# Altium PCB POV_Display.PcbDoc (part 4 of 4)
Units mm, origin at the board's own origin, x right, y up, seen from the top; angles counter-clockwise.
Board outline 207.01 x 48.01 mm, 4 copper layers (Top Layer, GND, Power, Bottom Layer), stack 1.586 mm thick; 227 components, 374 nets, 1196 pads, 657 vias.
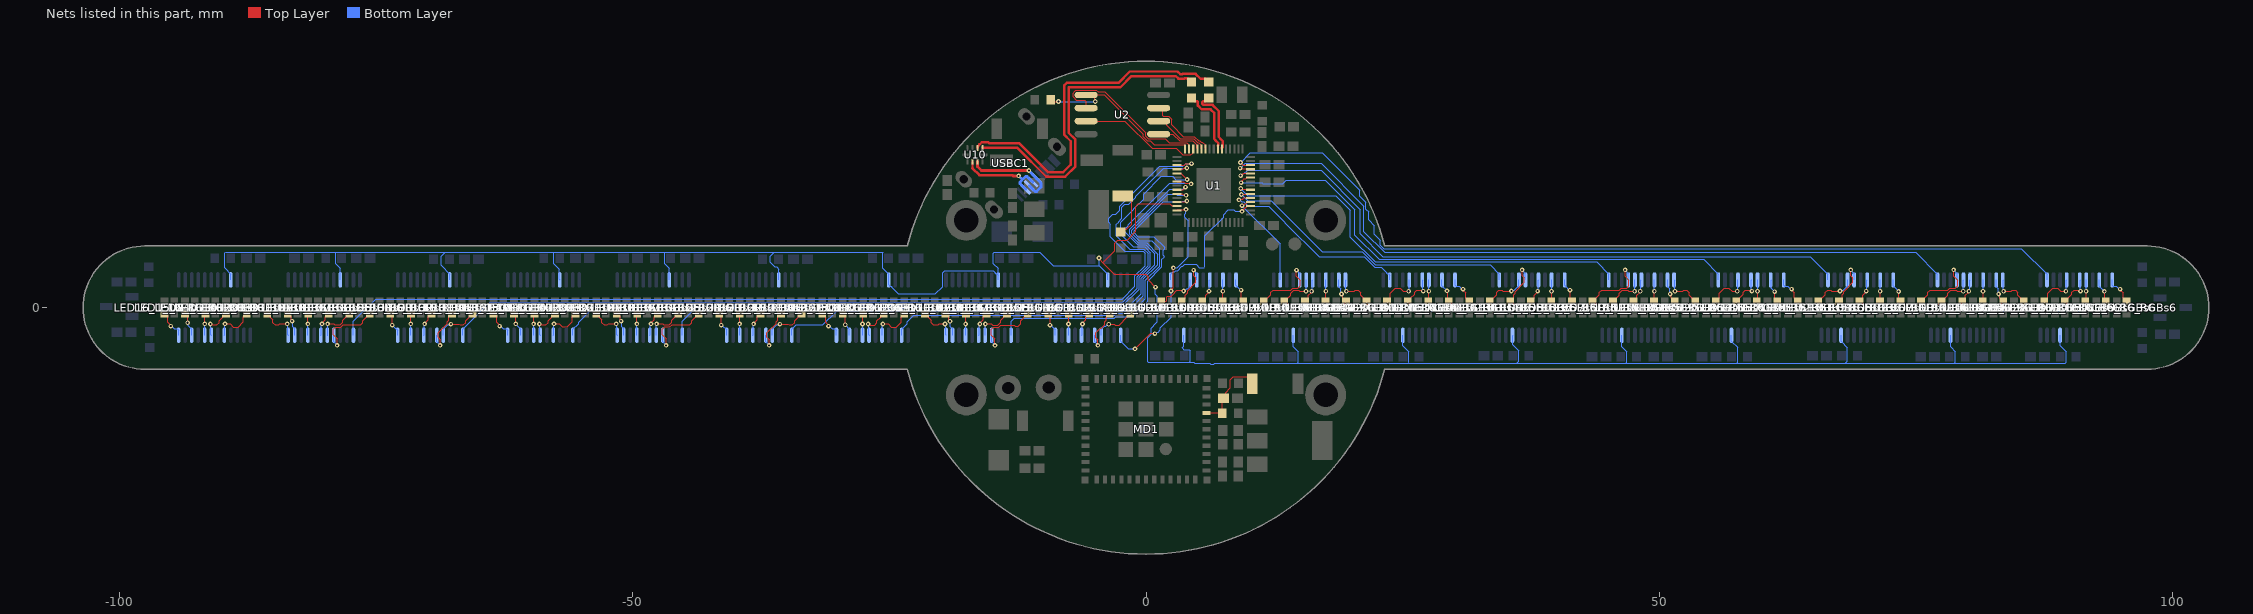
[diagram p6: the nets of this part, all layers, seen from the top]

## Via types
v1: diameter 0.45, hole 0.2, Top Layer to Bottom Layer, tented both sides, 605 vias
v2: diameter 0.65, hole 0.4, Top Layer to Bottom Layer, tented both sides, 28 vias
v3: diameter 0.5, hole 0.3, Top Layer to Bottom Layer, tented both sides, 12 vias
v4: diameter 0.45, hole 0.2, Top Layer to Bottom Layer, 12 vias

## Nets (pads, with @x,y where several pads share a name; then routed paths per layer and width w, separated by ;. In a path a pad name is that pad's centre, name@x,y a point inside that pad or via, vN(x,y) a via of type N, cw(c..) or ccw(c..) an arc to the next point about the centre after c; other vN are vias at no path point) (continued)
NetU1_3: U1.3 U7_U_16_RGBs3.2 | length 100.4
  Top Layer w0.1: U1.3@3.025,13.875 3.724,13.875 3.874,14.025 v1(4.425,14.025)
  Bottom Layer w0.1: U7_U_16_RGBs3.2@-77.18,-2.685 -77.18,-1.33 -75.025,0.825 -2.325,0.825 -1.075,2.075 -1.075,3.099 -0.075,4.099 -0.075,5.301 -0.28,5.506 -2.081,5.506 -3.475,6.9 -3.475,8.128 -3.65,8.303 -3.65,8.697 -3.247,9.1 -2.953,9.1 -2.55,9.503 -2.55,9.855 1.345,13.75 3.584,13.75 3.859,14.025 v1(4.425,14.025)
NetU1_4: U1.4 U6_U_16_RGBs3.2 | length 87.5
  Top Layer w0.1: U1.4@3.025,13.474 3.599,13.474 3.68,13.555 3.935,13.555 v1(3.973,13.594)
  Bottom Layer w0.1: U6_U_16_RGBs3.2@-66.52,-2.685 -66.52,-2.112 -63.883,0.525 -2.242,0.525 -0.875,1.892 -0.875,3.016 0.2,4.091 0.2,5.309 -0.197,5.706 -1.606,5.706 -2.9,7 -2.9,8.103 -2.672,8.331 -2.672,8.382 -2.35,8.704 -2.35,9.772 -2.072,10.05 -1.7,10.05 -0.983,10.767 -0.983,10.849 1.718,13.55 3.929,13.55 v1(3.973,13.594)
NetU1_5: U1.5 U8_U_16_RGBs2.2 | length 76.2
  Top Layer w0.1: U1.5@3.025,13.075 3.361,13.075 3.512,12.924 3.551,12.924 v1(4,12.475)
  Bottom Layer w0.1: U8_U_16_RGBs2.2@-55.814,-2.684 -55.814,-2.111 -55.258,-1.556 -55.258,-1.444 -53.539,0.275 -2.209,0.275 -0.675,1.809 -0.675,2.933 0.425,4.033 0.425,5.367 -0.114,5.906 -1.256,5.906 -2.472,7.122 -2.472,8.299 -1.198,9.573 -1.198,9.632 -0.725,10.105 -0.666,10.105 -0.233,10.538 -0.233,11.053 1.491,12.777 2.595,12.777 2.897,12.475 v1(4,12.475)
NetU1_7: U1.7 U7_U_16_RGBs2.2 | length 65.6
  Top Layer w0.1: U1.7@3.025,12.275 3.645,12.275 3.82,12.1 4.35,12.1 v1(4.4,12.05)
  Bottom Layer w0.1: U7_U_16_RGBs2.2@-45.144,-2.684 -45.144,-1.329 -43.839,-0.025 -1.825,-0.025 -0.45,1.35 -0.45,2.875 0.85,4.175 0.85,5.225 -0.031,6.106 -0.814,6.106 -2.189,7.481 -2.189,7.58 -2.001,7.768 -1.942,7.768 -1.722,7.988 -1.722,8.047 2.33,12.1 4.35,12.1 v1(4.4,12.05)
NetU1_9: U1.9 U6_U_16_RGBs2.2 | length 52.9
  Top Layer w0.1: U1.9@3.025,11.475 3.612,11.475 3.852,11.716 v1(3.852,11.725)
  Bottom Layer w0.1: U6_U_16_RGBs2.2@-34.484,-2.684 -34.484,-2.111 -34.059,-1.687 -31.476,-1.687 -30.139,-0.35 -1.742,-0.35 -0.25,1.142 -0.25,2.787 1.154,4.191 1.154,5.204 0.051,6.306 -0.731,6.306 -1.574,7.149 -1.574,7.62 2.33,11.525 3.558,11.525 3.758,11.725 v1(3.852,11.725)
NetU1_10: U1.10 U8_U_16_RGBs1.2 | length 42.5
  Top Layer w0.1: U1.10@3.025,11.074 U1.10@3.025,11.074 3.553,11.072 3.634,10.991 3.867,10.991 v1(3.916,10.942)
  Bottom Layer w0.1: U8_U_16_RGBs1.2@-23.796,-2.692 -23.796,-2.12 -23.241,-1.564 -23.241,-1.367 -22.599,-0.725 -3.059,-0.725 -2.884,-0.55 -1.475,-0.55 -0.05,0.875 -0.05,2.646 1.354,4.05 1.354,5.715 0.562,6.506 -0.648,6.506 -1.374,7.232 -1.374,7.537 2.124,11.036 2.925,11.036 3.02,10.942 v1(3.916,10.942)
NetU1_12: U1.12 U7_U_16_RGBs1.2 | length 32.5
  Top Layer w0.1: U1.12@3.025,10.274 3.075,10.324 3.921,10.324 v1(3.975,10.378)
  Bottom Layer w0.1: U7_U_16_RGBs1.2@-13.126,-2.692 -13.126,-1.337 -12.839,-1.05 -3.102,-1.05 -2.927,-0.875 -1.325,-0.875 0.15,0.6 0.15,2.563 1.554,3.967 1.554,4.69 1.778,4.914 1.778,4.997 1.671,5.104 1.671,5.58 1.825,5.734 1.825,5.862 0.762,6.925 -0.784,6.925 -1.133,7.274 -1.133,7.496 1.666,10.295 3.55,10.295 3.6,10.345 3.942,10.345 v1(3.975,10.378)
NetU1_14: U1.14 U6_U_16_RGBs1.2 | length 19.7
  Top Layer w0.1: v1(-1.069,-4.023) 0.442,-2.511 0.851,-2.511 v1(0.867,-2.527) ; v1(2.437,1.617) 2.437,1.697 2.663,1.922 v1(2.663,3.873) ; U1.14@3.025,9.473 3.06,9.509 3.834,9.509 v1(3.9,9.575)
  Bottom Layer w0.1: U6_U_16_RGBs1.2@-2.466,-2.692 -2.466,-3.265 -1.709,-4.023 v1(-1.069,-4.023) ; v1(0.867,-2.527) 0.962,-2.527 1.113,-2.375 1.18,-2.375 1.4,-2.155 1.4,-1.975 2.437,-0.938 v1(2.437,1.617) ; v1(2.663,3.873) 3.054,3.873 4.125,4.945 4.125,8.464 3.791,8.798 3.791,9.085 3.889,9.182 3.889,9.564 v1(3.9,9.575)
NetU1_33: U1.33 U6_U_16_RGBs4.2 | length 13.4
  Top Layer w0.1: v1(9.348,9.378) 9.348,9.399 9.676,9.726 9.69,9.726 9.838,9.875 U1.33@10.175,9.875
  Bottom Layer w0.1: U6_U_16_RGBs4.2@2.412,2.692 2.412,3.265 2.646,3.498 2.817,3.498 2.912,3.593 3.07,3.593 3.502,4.025 3.557,4.025 3.762,4.23 4.873,4.23 5.203,3.9 5.668,3.9 5.727,3.959 5.727,6.993 7.55,8.817 7.55,9.055 8.013,9.519 8.563,9.519 8.704,9.378 v1(9.348,9.378)
NetU1_34: U1.34 U7_U_16_RGBs4.2 | length 9.7
  Top Layer w0.1: v1(9.348,9.928) 9.442,9.928 9.651,10.137 9.702,10.137 9.838,10.274 U1.34@10.175,10.274
  Bottom Layer w0.1: v1(9.348,9.928) 13.073,6.204 U7_U_16_RGBs4.2@13.073,2.692
NetU1_35: U1.35 U8_U_16_RGBs4.2 | length 19.4
  Top Layer w0.1: v1(9.05,10.5) 9.115,10.565 9.425,10.565 9.535,10.675 U1.35@10.175,10.675
  Bottom Layer w0.1: v1(9.05,10.5) 9.145,10.5 9.341,10.303 9.503,10.303 9.956,9.85 11.95,9.85 13.407,8.393 13.413,8.393 13.633,8.174 13.633,8.167 16.85,4.95 21.259,4.95 22.282,3.928 22.909,3.928 23.435,3.401 23.435,3.339 23.494,3.28 23.624,3.28 23.743,3.162 U8_U_16_RGBs4.2@23.743,2.692
NetU1_36: U1.36 U6_U_16_RGBs5.2 | length 29.8
  Top Layer w0.1: v1(9.278,11.014) 9.308,11.044 10.145,11.044 U1.36@10.175,11.074
  Bottom Layer w0.1: v1(9.278,11.014) 9.316,11.014 9.93,10.4 12.206,10.4 17.156,5.45 21.042,5.45 22.342,4.15 33.528,4.15 34.412,3.265 U6_U_16_RGBs5.2@34.412,2.692
NetU1_37: U1.37 U7_U_16_RGBs5.2 | length 42.4
  Top Layer w0.1: v1(9.225,11.6) 9.32,11.6 9.4,11.519 10.13,11.519 U1.37@10.175,11.475
  Bottom Layer w0.1: v1(9.225,11.6) v1(9.225,11.6) 9.922,10.9 18.494,10.9 19.9,9.494 19.9,6.875 22.325,4.45 43.888,4.45 45.073,3.265 U7_U_16_RGBs5.2@45.073,2.692
NetU1_40: U1.40 U8_U_16_RGBs5.2 | length 53.6
  Top Layer w0.1: v1(9.27,12.163) 9.27,12.257 9.467,12.455 9.467,12.467 9.525,12.525 9.69,12.525 9.838,12.674 U1.40@10.175,12.674
  Bottom Layer w0.1: v1(9.27,12.163) 11.301,12.163 11.379,12.085 13.315,12.085 13.655,12.425 17.45,12.425 20.35,9.525 20.35,7.05 22.7,4.7 54.308,4.7 55.742,3.265 U8_U_16_RGBs5.2@55.742,2.692
NetU1_41: U1.41 U6_U_16_RGBs6.2 | length 64.6
  Top Layer w0.1: v1(9.209,12.847) 9.284,12.847 9.512,13.075 U1.41@10.175,13.075
  Bottom Layer w0.1: v1(9.209,12.847) 9.283,12.847 9.511,13.076 9.582,13.076 9.887,13.381 17.045,13.381 20.875,9.551 20.875,7.175 23.075,4.975 64.703,4.975 66.413,3.265 U6_U_16_RGBs6.2@66.413,2.692
NetU1_42: U1.42 U7_U_16_RGBs6.2 | length 75.6
  Top Layer w0.1: v1(9.17,13.582) 9.228,13.524 10.125,13.524 U1.42@10.175,13.474
  Bottom Layer w0.1: v1(9.17,13.582) 9.21,13.582 9.679,14.05 17.05,14.05 21.223,9.877 21.223,7.392 23.24,5.375 74.963,5.375 77.073,3.265 U7_U_16_RGBs6.2@77.073,2.692
NetU1_43: U1.43 U8_U_16_RGBs6.2 | length 87.4
  Top Layer w0.1: v1(9.205,14.13) 9.225,14.13 9.48,13.875 U1.43@10.175,13.875
  Bottom Layer w0.1: v1(9.205,14.13) 10.15,15.075 17.161,15.075 20.823,11.413 20.823,10.839 21.423,10.239 21.423,9.569 21.675,9.317 21.675,8.553 22.25,7.978 22.25,7.121 22.826,6.545 22.826,6.072 23.143,5.755 85.253,5.755 87.743,3.265 U8_U_16_RGBs6.2@87.743,2.692
OE: U1.13 U6_U_16_RGBs1.21 U6_U_16_RGBs2.21 U6_U_16_RGBs3.21 U6_U_16_RGBs4.21 U6_U_16_RGBs5.21 U6_U_16_RGBs6.21 U7_U_16_RGBs1.21 U7_U_16_RGBs2.21 U7_U_16_RGBs3.21 U7_U_16_RGBs4.21 U7_U_16_RGBs5.21 U7_U_16_RGBs6.21 U8_U_16_RGBs1.21 U8_U_16_RGBs2.21 U8_U_16_RGBs3.21 U8_U_16_RGBs4.21 U8_U_16_RGBs5.21 U8_U_16_RGBs6.21 | length 258.1
  Top Layer w0.1: v1(-4.576,4.829) -4.576,4.745 -4.212,4.38 ; v1(0.925,2) 0.217,2.708 0.217,3.008 -0.025,3.25 -3.082,3.25 -4.212,4.38 ; U1.13@3.025,9.875 2.974,9.925 2.496,9.925 2.327,10.095 -0.736,10.095 -1,9.83 -1,9.52 -0.999,9.519 -0.999,7.422 -1.849,6.572 -2.774,6.572 -3.056,6.29 -3.056,5.536 -4.212,4.38
  Bottom Layer w0.1: U8_U_16_RGBs3.21@-89.12,2.7 -89.12,3.273 -89.71,3.863 -89.71,5.326 -89.622,5.414 -78.822,5.414 ; U7_U_16_RGBs3.21@-78.45,2.7 -78.45,3.829 -78.91,4.289 -78.91,5.326 -78.822,5.414 ; U6_U_16_RGBs3.21@-67.79,2.7 -67.79,3.273 -68.636,4.119 -68.636,5 -68.222,5.414 ; U8_U_16_RGBs2.21@-57.084,2.701 -57.133,2.749 -57.133,3.749 -57.674,4.29 -57.674,5.326 -57.586,5.414 ; U7_U_16_RGBs2.21@-46.414,2.701 -46.414,3.83 -46.874,4.29 -46.874,5.326 -46.786,5.414 ; U6_U_16_RGBs2.21@-35.754,2.701 -35.754,3.751 -35.973,3.971 -36.154,3.971 -36.6,4.416 -36.6,5 -36.194,5.406 ; U7_U_16_RGBs1.21@-14.396,2.692 U7_U_16_RGBs1.21@-14.396,3.162 ; v1(-4.576,4.829) -4.565,4.818 -4.565,4.094 ; U6_U_16_RGBs1.21@-3.736,2.692 -3.736,3.265 -4.565,4.094 ; v1(0.925,2) 0.925,1.281 1.105,1.101 1.105,-1.395 0.875,-1.625 0.87,-1.625 0.65,-1.845 0.65,-1.85 0.5,-2 0.5,-2.363 0.492,-2.371 0.492,-2.6 0.175,-2.917 0.175,-5.247 0.234,-5.306 4.215,-5.306 ; U6_U_16_RGBs4.21@3.682,-2.692 3.682,-3.782 3.533,-3.932 3.696,-4.094 4.215,-4.094 4.303,-4.182 4.303,-5.218 4.215,-5.306 ; U7_U_16_RGBs4.21@14.343,-2.692 14.343,-3.822 14.803,-4.282 14.803,-5.318 14.715,-5.406 ; U8_U_16_RGBs4.21@25.013,-2.692 25.013,-3.692 25.603,-4.282 25.603,-5.318 25.515,-5.406 ; U6_U_16_RGBs5.21@35.682,-2.692 35.714,-2.724 35.714,-3.593 36.303,-4.182 36.303,-5.218 36.115,-5.406 ; U7_U_16_RGBs5.21@46.343,-2.692 46.343,-3.822 46.803,-4.282 46.803,-5.318 46.703,-5.418 ; U8_U_16_RGBs5.21@57.012,-2.692 57.012,-3.265 57.603,-3.855 57.603,-5.318 57.503,-5.418 ; U6_U_16_RGBs6.21@67.683,-2.692 67.683,-3.265 68.303,-3.885 68.303,-5.218 68.103,-5.418 ; U7_U_16_RGBs6.21@78.343,-2.692 78.343,-3.822 78.803,-4.282 78.803,-5.318 78.703,-5.418 ; U8_U_16_RGBs6.21@89.013,-2.692 89.013,-3.692 89.603,-4.282 89.603,-5.318 89.503,-5.418 78.703,-5.418 ; -78.822,5.414 -68.222,5.414 ; -68.222,5.414 -57.586,5.414 ; -57.586,5.414 -46.786,5.414 ; -46.786,5.414 -36.202,5.414 -36.194,5.406 ; -36.194,5.406 -25.569,5.406 -25.657,5.318 -25.657,3.857 -25.066,3.266 -25.066,2.223 -24.948,2.105 -24.818,2.105 -24.759,2.046 -24.759,1.984 -24.112,1.336 -20.502,1.336 -19.804,2.034 -19.804,3.401 -19.612,3.593 -14.896,3.593 -14.704,3.401 -14.704,3.339 -14.645,3.28 -14.515,3.28 U7_U_16_RGBs1.21@-14.396,3.162 ; U7_U_16_RGBs1.21@-14.396,3.162 -14.396,3.822 -14.857,4.282 -14.857,5.318 -14.769,5.406 -10.358,5.406 -9.046,4.094 -4.565,4.094 ; 4.215,-5.306 4.669,-5.306 4.769,-5.406 6.217,-5.406 6.31,-5.5 6.621,-5.5 6.715,-5.406 14.715,-5.406 ; 14.715,-5.406 25.515,-5.406 ; 25.515,-5.406 36.115,-5.406 ; 36.115,-5.406 36.127,-5.418 46.703,-5.418 ; 46.703,-5.418 57.503,-5.418 ; 57.503,-5.418 68.103,-5.418 ; 68.103,-5.418 78.703,-5.418
QSPI_SCLK: U1.56 U2.6 | length 5.6
  Top Layer w0.1: U2.6@1.231,18.165 1.797,18.165 2.041,17.92 2.041,17.759 3.35,16.45 3.567,16.45 4.632,16.45 5.032,16.05 5.148,16.05 5.249,15.949 5.249,15.938 5.4,15.787 U1.56@5.4,15.45
QSPI_SD0: U1.57 U2.5 | length 4.6
  Top Layer w0.1: U2.5@1.231,16.895 2.622,16.895 3.267,16.25 4.549,16.25 4.85,15.949 4.85,15.935 4.948,15.837 4.948,15.5 U1.57@4.998,15.45
QSPI_SD1: U1.59 U2.2 | length 16.6
  Top Layer w0.1: U2.2@-5.831,19.435 -5.831,20.05 -5.981,20.2 -6.793,20.2 -7.106,20.512 -7.106,20.898 -6.948,21.055 -6.833,21.17 -4.828,21.17 -4.713,21.055 -4.67,21.012 -4.037,21.012 -0.045,17.02 -0.045,16.702 0.228,16.43 1.898,16.43 2.278,16.05 3.949,16.05 4.05,15.949 4.05,15.935 4.198,15.787 U1.59@4.198,15.45
QSPI_SD2: U1.58 U2.3 | length 12.2
  Top Layer w0.1: U2.3@-5.831,18.165 -2.073,18.165 0.586,15.506 2.943,15.506 3.586,14.863 4.361,14.863 4.549,15.052 4.549,15.4 U1.58@4.6,15.45
QSPI_SD3: U1.55 U2.7 | length 7
  Top Layer w0.1: U2.7@1.231,19.435 1.392,19.435 1.637,19.19 1.637,18.689 1.696,18.63 2.233,18.63 2.506,18.358 2.506,17.794 3.65,16.65 4.715,16.65 5.115,16.25 5.231,16.25 5.381,16.1 5.5,16.1 5.748,15.851 5.748,15.5 U1.55@5.798,15.45
QSPI_SS: R6.2 U1.60 U2.1 | length 17.3
  Top Layer w0.1: R6.2@-9.273,20.225 -9.118,20.07 v1(-8.519,20.07) ; U2.1@-5.831,20.705 U2.1@-5.25,20.705 ; v1(-4.941,20.07) -5.006,20.135 -5.006,20.46 U2.1@-5.25,20.705 ; U1.60@3.799,15.45 3.799,15.787 3.749,15.837 0.821,15.837 0.428,16.23 0.145,16.23 -0.245,16.62 -0.245,16.902 -4.047,20.705 U2.1@-5.25,20.705
  Bottom Layer w0.1: v1(-8.519,20.07) v1(-4.941,20.07)
R0_U_16_RGBs1: LED1_U_16_RGBs1.4 U6_U_16_RGBs1.5 | length 4.1
  Top Layer w0.1: v1(-3.629,-1.617) -3.075,-1.617 -2.997,-1.695 -2.586,-1.695 -2.204,-1.313 -2.204,-1.271 -1.553,-0.62 LED1_U_16_RGBs1.4@-1.529,-0.62
  Bottom Layer w0.1: U6_U_16_RGBs1.5@-4.371,-2.692 -4.371,-2.12 -4.05,-1.798 -3.904,-1.798 -3.724,-1.617 v1(-3.629,-1.617)
R0_U_16_RGBs2: LED1_U_16_RGBs2.4 U6_U_16_RGBs2.5 | length 4.2
  Top Layer w0.1: v1(-35.651,-1.609) -34.829,-1.609 -34.752,-1.687 -34.441,-1.687 -34.221,-1.467 -34.221,-1.263 -33.57,-0.612 LED1_U_16_RGBs2.4@-33.546,-0.612
  Bottom Layer w0.1: U6_U_16_RGBs2.5@-36.389,-2.684 -36.389,-2.111 -35.953,-1.676 -35.718,-1.676 v1(-35.651,-1.609)
R0_U_16_RGBs3: LED1_U_16_RGBs3.4 U6_U_16_RGBs3.5 | length 4.2
  Top Layer w0.1: v1(-67.687,-1.61) -66.866,-1.61 -66.788,-1.688 -66.477,-1.688 -66.257,-1.468 -66.257,-1.263 -65.607,-0.612 LED1_U_16_RGBs3.4@-65.582,-0.612
  Bottom Layer w0.1: U6_U_16_RGBs3.5@-68.425,-2.685 -68.425,-2.112 -67.99,-1.677 -67.754,-1.677 v1(-67.687,-1.61)
R0_U_16_RGBs4: LED1_U_16_RGBs4.4 U6_U_16_RGBs4.5 | length 4.3
  Top Layer w0.1: LED1_U_16_RGBs4.4@1.475,0.62 1.942,0.62 2,0.678 2,1.032 2.088,1.12 2.47,1.12 2.812,1.462 2.812,1.49 2.993,1.67 3.618,1.67 v1(3.671,1.617)
  Bottom Layer w0.1: v1(3.671,1.617) 3.744,1.617 3.973,1.846 4.043,1.846 4.317,2.12 U6_U_16_RGBs4.5@4.317,2.692
R0_U_16_RGBs5: LED1_U_16_RGBs5.4 U6_U_16_RGBs5.5 | length 4.2
  Top Layer w0.1: LED1_U_16_RGBs5.4@33.475,0.62 33.499,0.62 34.15,1.271 34.15,1.476 34.37,1.695 34.68,1.695 34.758,1.617 v1(35.58,1.617)
  Bottom Layer w0.1: v1(35.58,1.617) 35.647,1.684 35.882,1.684 36.317,2.12 U6_U_16_RGBs5.5@36.317,2.692
R0_U_16_RGBs6: LED1_U_16_RGBs6.4 U6_U_16_RGBs6.5 | length 4.2
  Top Layer w0.1: LED1_U_16_RGBs6.4@65.475,0.62 65.499,0.62 66.15,1.271 66.15,1.476 66.37,1.695 66.68,1.695 66.758,1.617 v1(67.58,1.617)
  Bottom Layer w0.1: v1(67.58,1.617) 67.647,1.684 67.882,1.684 68.318,2.12 U6_U_16_RGBs6.5@68.318,2.692
R1_U_16_RGBs1: LED2_U_16_RGBs1.4 U6_U_16_RGBs1.6 | length 4.9
  Top Layer w0.1: v1(-4.684,-3.683) -4.684,-3.121 -4.891,-2.913 -4.891,-2.446 -4.446,-2 -4.341,-2 -4.004,-1.663 -4.004,-1.558 -4.004,-1.379 -3.854,-1.229 -3.854,-0.92 -3.553,-0.62 LED2_U_16_RGBs1.4@-3.529,-0.62
  Bottom Layer w0.1: U6_U_16_RGBs1.6@-5.006,-2.692 -5.006,-3.313 -4.684,-3.635 v1(-4.684,-3.683)
R1_U_16_RGBs2: LED2_U_16_RGBs2.4 U6_U_16_RGBs2.6 | length 4.9
  Top Layer w0.1: v1(-36.701,-3.675) -36.701,-3.113 -36.909,-2.905 -36.909,-2.438 -36.021,-1.55 -36.021,-1.371 -35.871,-1.221 -35.871,-0.912 -35.57,-0.612 LED2_U_16_RGBs2.4@-35.546,-0.612
  Bottom Layer w0.1: U6_U_16_RGBs2.6@-37.024,-2.684 -37.024,-3.304 -36.701,-3.627 v1(-36.701,-3.675)
R1_U_16_RGBs3: LED2_U_16_RGBs3.4 U6_U_16_RGBs3.6 | length 4.9
  Top Layer w0.1: v1(-68.737,-3.675) -68.737,-3.113 -68.945,-2.906 -68.945,-2.438 -68.057,-1.551 -68.057,-1.372 -67.907,-1.221 -67.907,-0.913 -67.607,-0.612 LED2_U_16_RGBs3.4@-67.582,-0.612
  Bottom Layer w0.1: U6_U_16_RGBs3.6@-69.06,-2.685 -69.06,-3.305 -68.737,-3.628 v1(-68.737,-3.675)
R1_U_16_RGBs4: LED2_U_16_RGBs4.4 U6_U_16_RGBs4.6 | length 4.8
  Top Layer w0.1: LED2_U_16_RGBs4.4@3.475,0.62 3.499,0.62 3.8,0.92 3.8,1.215 4.046,1.462 4.046,1.655 4.837,2.446 4.837,2.913 4.63,3.121 4.63,3.65 v1(4.635,3.655)
  Bottom Layer w0.1: v1(4.635,3.655) 4.635,3.619 4.952,3.301 U6_U_16_RGBs4.6@4.952,2.692
R1_U_16_RGBs5: LED2_U_16_RGBs5.4 U6_U_16_RGBs5.6 | length 4.9
  Top Layer w0.1: LED2_U_16_RGBs5.4@35.475,0.62 35.499,0.62 35.8,0.92 35.8,1.229 35.95,1.379 35.95,1.558 36.837,2.446 36.837,2.913 36.63,3.121 v1(36.63,3.683)
  Bottom Layer w0.1: v1(36.63,3.683) 36.63,3.635 36.952,3.313 U6_U_16_RGBs5.6@36.952,2.692
R1_U_16_RGBs6: LED2_U_16_RGBs6.4 U6_U_16_RGBs6.6 | length 4.9
  Top Layer w0.1: LED2_U_16_RGBs6.4@67.475,0.62 67.499,0.62 67.8,0.92 67.8,1.229 67.95,1.379 67.95,1.558 68.837,2.446 68.837,2.913 68.63,3.121 v1(68.63,3.683)
  Bottom Layer w0.1: v1(68.63,3.683) 68.63,3.635 68.953,3.313 U6_U_16_RGBs6.6@68.953,2.692
R2_U_16_RGBs1: LED3_U_16_RGBs1.4 U6_U_16_RGBs1.8 | length 2.4
  Top Layer w0.1: v1(-6.188,-1.597) -6.188,-1.527 -5.854,-1.192 -5.854,-0.92 -5.553,-0.62 LED3_U_16_RGBs1.4@-5.529,-0.62
  Bottom Layer w0.1: U6_U_16_RGBs1.8@-6.276,-2.692 -6.232,-2.648 -6.232,-1.641 v1(-6.188,-1.597)
R2_U_16_RGBs2: LED3_U_16_RGBs2.4 U6_U_16_RGBs2.8 | length 2.4
  Top Layer w0.1: v1(-38.209,-1.589) -38.209,-1.522 -37.871,-1.184 -37.871,-0.912 -37.57,-0.612 LED3_U_16_RGBs2.4@-37.546,-0.612
  Bottom Layer w0.1: U6_U_16_RGBs2.8@-38.294,-2.684 -38.251,-2.642 -38.251,-1.631 v1(-38.209,-1.589)
R2_U_16_RGBs3: LED3_U_16_RGBs3.4 U6_U_16_RGBs3.8 | length 2.4
  Top Layer w0.1: v1(-70.245,-1.589) -70.245,-1.523 -69.907,-1.185 -69.907,-0.913 -69.607,-0.612 LED3_U_16_RGBs3.4@-69.582,-0.612
  Bottom Layer w0.1: U6_U_16_RGBs3.8@-70.33,-2.685 -70.287,-2.642 -70.287,-1.632 v1(-70.245,-1.589)
R2_U_16_RGBs4: LED3_U_16_RGBs4.4 U6_U_16_RGBs4.8 | length 2.4
  Top Layer w0.1: LED3_U_16_RGBs4.4@5.475,0.62 5.499,0.62 5.8,0.92 5.8,1.192 6.137,1.53 v1(6.137,1.597)
  Bottom Layer w0.1: v1(6.137,1.597) 6.18,1.639 6.18,2.65 U6_U_16_RGBs4.8@6.222,2.692
R2_U_16_RGBs5: LED3_U_16_RGBs5.4 U6_U_16_RGBs5.8 | length 2.4
  Top Layer w0.1: LED3_U_16_RGBs5.4@37.475,0.62 37.499,0.62 37.8,0.92 37.8,1.192 38.137,1.53 v1(38.137,1.597)
  Bottom Layer w0.1: v1(38.137,1.597) 38.18,1.639 38.18,2.65 U6_U_16_RGBs5.8@38.222,2.692
R2_U_16_RGBs6: LED3_U_16_RGBs6.4 U6_U_16_RGBs6.8 | length 2.4
  Top Layer w0.1: LED3_U_16_RGBs6.4@69.475,0.62 69.499,0.62 69.8,0.92 69.8,1.192 70.137,1.53 v1(70.137,1.597)
  Bottom Layer w0.1: v1(70.137,1.597) 70.18,1.639 70.18,2.65 U6_U_16_RGBs6.8@70.223,2.692
R3_U_16_RGBs1: LED4_U_16_RGBs1.4 U6_U_16_RGBs1.10 | length 2.1
  Top Layer w0.1: v1(-7.546,-1.592) -7.546,-0.637 LED4_U_16_RGBs1.4@-7.529,-0.62
  Bottom Layer w0.1: U6_U_16_RGBs1.10@-7.546,-2.692 v1(-7.546,-1.592)
R3_U_16_RGBs2: LED4_U_16_RGBs2.4 U6_U_16_RGBs2.10 | length 2.1
  Top Layer w0.1: v1(-39.564,-1.584) -39.564,-0.629 LED4_U_16_RGBs2.4@-39.546,-0.612
  Bottom Layer w0.1: U6_U_16_RGBs2.10@-39.564,-2.684 v1(-39.564,-1.584)
R3_U_16_RGBs3: LED4_U_16_RGBs3.4 U6_U_16_RGBs3.10 | length 2.1
  Top Layer w0.1: v1(-71.6,-1.584) -71.6,-0.63 LED4_U_16_RGBs3.4@-71.582,-0.612
  Bottom Layer w0.1: U6_U_16_RGBs3.10@-71.6,-2.685 v1(-71.6,-1.584)
R3_U_16_RGBs4: LED4_U_16_RGBs4.4 U6_U_16_RGBs4.10 | length 2.1
  Top Layer w0.1: LED4_U_16_RGBs4.4@7.475,0.62 7.492,0.637 7.492,1.581 v1(7.481,1.593)
  Bottom Layer w0.1: v1(7.481,1.593) 7.487,1.599 7.487,2.686 U6_U_16_RGBs4.10@7.492,2.692
R3_U_16_RGBs5: LED4_U_16_RGBs5.4 U6_U_16_RGBs5.10 | length 2.1
  Top Layer w0.1: LED4_U_16_RGBs5.4@39.475,0.62 39.492,0.637 v1(39.492,1.592)
  Bottom Layer w0.1: v1(39.492,1.592) U6_U_16_RGBs5.10@39.492,2.692
R3_U_16_RGBs6: LED4_U_16_RGBs6.4 U6_U_16_RGBs6.10 | length 2.1
  Top Layer w0.1: LED4_U_16_RGBs6.4@71.475,0.62 71.493,0.637 v1(71.493,1.592)
  Bottom Layer w0.1: v1(71.493,1.592) U6_U_16_RGBs6.10@71.493,2.692
R4_U_16_RGBs1: LED5_U_16_RGBs1.4 U6_U_16_RGBs1.12 | length 2.4
  Top Layer w0.1: LED5_U_16_RGBs1.4@-9.529,-0.62 -9.346,-0.802 v1(-9.346,-1.708)
  Bottom Layer w0.1: v1(-9.346,-1.708) -9.287,-1.708 -8.816,-2.179 U6_U_16_RGBs1.12@-8.816,-2.692
R4_U_16_RGBs2: LED5_U_16_RGBs2.4 U6_U_16_RGBs2.12 | length 2.4
  Top Layer w0.1: LED5_U_16_RGBs2.4@-41.546,-0.612 -41.364,-0.794 v1(-41.364,-1.699)
  Bottom Layer w0.1: v1(-41.364,-1.699) -41.305,-1.699 -40.834,-2.17 U6_U_16_RGBs2.12@-40.834,-2.684
R4_U_16_RGBs3: LED5_U_16_RGBs3.4 U6_U_16_RGBs3.12 | length 2.4
  Top Layer w0.1: LED5_U_16_RGBs3.4@-73.582,-0.612 -73.4,-0.795 v1(-73.4,-1.7)
  Bottom Layer w0.1: v1(-73.4,-1.7) -73.037,-2.063 -72.988,-2.063 -72.87,-2.181 U6_U_16_RGBs3.12@-72.87,-2.685
R4_U_16_RGBs4: LED5_U_16_RGBs4.4 U6_U_16_RGBs4.12 | length 2.4
  Top Layer w0.1: v1(9.268,1.708) 9.268,0.827 LED5_U_16_RGBs4.4@9.475,0.62
  Bottom Layer w0.1: U6_U_16_RGBs4.12@8.762,2.692 8.762,2.179 9.234,1.708 v1(9.268,1.708)
R4_U_16_RGBs5: LED5_U_16_RGBs5.4 U6_U_16_RGBs5.12 | length 2.4
  Top Layer w0.1: v1(41.293,1.708) 41.293,0.802 LED5_U_16_RGBs5.4@41.475,0.62
  Bottom Layer w0.1: U6_U_16_RGBs5.12@40.762,2.692 40.762,2.179 41.234,1.708 v1(41.293,1.708)
R4_U_16_RGBs6: LED5_U_16_RGBs6.4 U6_U_16_RGBs6.12 | length 2.4
  Top Layer w0.1: v1(73.3,1.575) 73.3,0.795 LED5_U_16_RGBs6.4@73.475,0.62
  Bottom Layer w0.1: U6_U_16_RGBs6.12@72.763,2.692 72.763,2.116 73.3,1.579 v1(73.3,1.575)
R5_U_16_RGBs1: LED6_U_16_RGBs1.4 U7_U_16_RGBs1.5 | length 7.3
  Top Layer w0.1: v1(-14.707,-3.682) -14.707,-3.045 -15.082,-2.67 -15.082,-2.128 -14.849,-1.895 -14.341,-1.895 -14.141,-1.695 -12.839,-1.695 -12.734,-1.8 -12.424,-1.8 -12.204,-1.58 -12.204,-1.476 -12.204,-1.271 -11.553,-0.62 LED6_U_16_RGBs1.4@-11.529,-0.62
  Bottom Layer w0.1: U7_U_16_RGBs1.5@-15.031,-2.692 -15.031,-3.311 -14.707,-3.635 v1(-14.707,-3.682)
R5_U_16_RGBs2: LED6_U_16_RGBs2.4 U7_U_16_RGBs2.5 | length 7.1
  Top Layer w0.1: v1(-46.725,-3.674) -46.725,-3.036 -47.099,-2.662 -47.099,-2.12 -46.866,-1.887 -46.358,-1.887 -46.158,-1.687 -44.441,-1.687 -44.221,-1.467 -44.221,-1.262 -43.57,-0.612 LED6_U_16_RGBs2.4@-43.546,-0.612
  Bottom Layer w0.1: U7_U_16_RGBs2.5@-47.049,-2.684 -47.049,-3.303 -46.725,-3.627 v1(-46.725,-3.674)
R5_U_16_RGBs3: LED6_U_16_RGBs3.4 U7_U_16_RGBs3.5 | length 7.1
  Top Layer w0.1: v1(-78.761,-3.674) -78.761,-3.037 -79.135,-2.663 -79.135,-2.12 -78.903,-1.888 -78.394,-1.888 -78.194,-1.688 -76.477,-1.688 -76.257,-1.468 -76.257,-1.263 -75.607,-0.612 LED6_U_16_RGBs3.4@-75.582,-0.612
  Bottom Layer w0.1: U7_U_16_RGBs3.5@-79.085,-2.685 -79.085,-3.304 -78.761,-3.628 v1(-78.761,-3.674)
R5_U_16_RGBs4: LED6_U_16_RGBs4.4 U7_U_16_RGBs4.5 | length 7.1
  Top Layer w0.1: LED6_U_16_RGBs4.4@11.475,0.62 11.499,0.62 12.15,1.271 12.15,1.476 12.37,1.695 14.087,1.695 14.287,1.895 14.795,1.895 15.028,2.128 15.028,2.67 14.653,3.045 14.653,3.649 v1(14.66,3.655)
  Bottom Layer w0.1: v1(14.66,3.655) 14.66,3.619 14.978,3.301 U7_U_16_RGBs4.5@14.978,2.692
R5_U_16_RGBs5: LED6_U_16_RGBs5.4 U7_U_16_RGBs5.5 | length 7.1
  Top Layer w0.1: LED6_U_16_RGBs5.4@43.475,0.62 43.499,0.62 44.15,1.271 44.15,1.476 44.37,1.695 46.087,1.695 46.287,1.895 46.795,1.895 47.028,2.128 47.028,2.67 46.653,3.045 v1(46.653,3.682)
  Bottom Layer w0.1: v1(46.653,3.682) 46.653,3.635 46.978,3.311 U7_U_16_RGBs5.5@46.978,2.692
R5_U_16_RGBs6: LED6_U_16_RGBs6.4 U7_U_16_RGBs6.5 | length 7.1
  Top Layer w0.1: LED6_U_16_RGBs6.4@75.475,0.62 75.499,0.62 76.15,1.271 76.15,1.476 76.37,1.695 78.087,1.695 78.287,1.895 78.795,1.895 79.028,2.128 79.028,2.67 78.653,3.045 v1(78.653,3.682)
  Bottom Layer w0.1: v1(78.653,3.682) 78.653,3.635 78.978,3.311 U7_U_16_RGBs6.5@78.978,2.692
R6_U_16_RGBs1: LED7_U_16_RGBs1.4 U7_U_16_RGBs1.6 | length 3.8
  Top Layer w0.1: v1(-15.636,-1.592) -15.049,-1.592 -14.946,-1.695 -14.424,-1.695 -14.15,-1.422 -14.15,-1.217 -13.553,-0.62 LED7_U_16_RGBs1.4@-13.529,-0.62
  Bottom Layer w0.1: U7_U_16_RGBs1.6@-15.666,-2.692 -15.651,-2.677 -15.651,-1.607 v1(-15.636,-1.592)
R6_U_16_RGBs2: LED7_U_16_RGBs2.4 U7_U_16_RGBs2.6 | length 3.8
  Top Layer w0.1: v1(-47.654,-1.584) -47.067,-1.584 -46.963,-1.687 -46.441,-1.687 -46.167,-1.414 -46.167,-1.209 -45.57,-0.612 LED7_U_16_RGBs2.4@-45.546,-0.612
  Bottom Layer w0.1: U7_U_16_RGBs2.6@-47.684,-2.684 -47.669,-2.669 -47.669,-1.599 v1(-47.654,-1.584)
R6_U_16_RGBs3: LED7_U_16_RGBs3.4 U7_U_16_RGBs3.6 | length 3.8
  Top Layer w0.1: v1(-79.69,-1.584) -79.103,-1.584 -79,-1.688 -78.477,-1.688 -78.204,-1.414 -78.204,-1.209 -77.607,-0.612 LED7_U_16_RGBs3.4@-77.582,-0.612
  Bottom Layer w0.1: U7_U_16_RGBs3.6@-79.72,-2.685 -79.705,-2.67 -79.705,-1.599 v1(-79.69,-1.584)
R6_U_16_RGBs4: LED7_U_16_RGBs4.4 U7_U_16_RGBs4.6 | length 3.8
  Top Layer w0.1: LED7_U_16_RGBs4.4@13.475,0.62 13.499,0.62 14.096,1.217 14.096,1.422 14.37,1.695 14.892,1.695 14.995,1.592 v1(15.583,1.592)
  Bottom Layer w0.1: v1(15.583,1.592) 15.597,1.607 15.597,2.677 U7_U_16_RGBs4.6@15.613,2.692
R6_U_16_RGBs5: LED7_U_16_RGBs5.4 U7_U_16_RGBs5.6 | length 3.8
  Top Layer w0.1: LED7_U_16_RGBs5.4@45.475,0.62 45.499,0.62 46.096,1.217 46.096,1.422 46.37,1.695 46.892,1.695 46.995,1.592 v1(47.583,1.592)
  Bottom Layer w0.1: v1(47.583,1.592) 47.597,1.607 47.597,2.677 U7_U_16_RGBs5.6@47.613,2.692
R6_U_16_RGBs6: LED7_U_16_RGBs6.4 U7_U_16_RGBs6.6 | length 3.8
  Top Layer w0.1: LED7_U_16_RGBs6.4@77.475,0.62 77.499,0.62 78.096,1.217 78.096,1.422 78.37,1.695 78.892,1.695 78.995,1.592 v1(79.583,1.592)
  Bottom Layer w0.1: v1(79.583,1.592) 79.598,1.607 79.598,2.677 U7_U_16_RGBs6.6@79.613,2.692
R7_U_16_RGBs1: LED8_U_16_RGBs1.4 U7_U_16_RGBs1.7 | length 2.4
  Top Layer w0.1: v1(-16.186,-1.592) -16.186,-1.515 -15.854,-1.182 -15.854,-0.92 -15.553,-0.62 LED8_U_16_RGBs1.4@-15.529,-0.62
  Bottom Layer w0.1: U7_U_16_RGBs1.7@-16.301,-2.692 -16.253,-2.643 -16.253,-1.658 v1(-16.186,-1.592)
R7_U_16_RGBs2: LED8_U_16_RGBs2.4 U7_U_16_RGBs2.7 | length 2.4
  Top Layer w0.1: v1(-48.204,-1.584) -48.204,-1.507 -47.871,-1.174 -47.871,-0.912 -47.57,-0.612 LED8_U_16_RGBs2.4@-47.546,-0.612
  Bottom Layer w0.1: U7_U_16_RGBs2.7@-48.319,-2.684 -48.27,-2.635 -48.27,-1.65 v1(-48.204,-1.584)
R7_U_16_RGBs3: LED8_U_16_RGBs3.4 U7_U_16_RGBs3.7 | length 2.4
  Top Layer w0.1: v1(-80.24,-1.584) -80.24,-1.508 -79.907,-1.175 -79.907,-0.913 -79.607,-0.612 LED8_U_16_RGBs3.4@-79.582,-0.612
  Bottom Layer w0.1: U7_U_16_RGBs3.7@-80.355,-2.685 -80.306,-2.636 -80.306,-1.65 v1(-80.24,-1.584)
R7_U_16_RGBs4: LED8_U_16_RGBs4.4 U7_U_16_RGBs4.7 | length 2.4
  Top Layer w0.1: LED8_U_16_RGBs4.4@15.475,0.62 15.499,0.62 15.8,0.92 15.8,1.182 16.133,1.515 v1(16.133,1.592)
  Bottom Layer w0.1: v1(16.133,1.592) 16.199,1.658 16.199,2.643 U7_U_16_RGBs4.7@16.248,2.692
R7_U_16_RGBs5: LED8_U_16_RGBs5.4 U7_U_16_RGBs5.7 | length 2.4
  Top Layer w0.1: LED8_U_16_RGBs5.4@47.475,0.62 47.499,0.62 47.8,0.92 47.8,1.182 48.132,1.515 v1(48.132,1.592)
  Bottom Layer w0.1: v1(48.132,1.592) 48.199,1.658 48.199,2.643 U7_U_16_RGBs5.7@48.248,2.692
R7_U_16_RGBs6: LED8_U_16_RGBs6.4 U7_U_16_RGBs6.7 | length 2.4
  Top Layer w0.1: LED8_U_16_RGBs6.4@79.475,0.62 79.499,0.62 79.8,0.92 79.8,1.182 80.133,1.515 v1(80.133,1.592)
  Bottom Layer w0.1: v1(80.133,1.592) 80.199,1.658 80.199,2.643 U7_U_16_RGBs6.7@80.248,2.692
R8_U_16_RGBs1: LED9_U_16_RGBs1.4 U7_U_16_RGBs1.9 | length 2.1
  Top Layer w0.1: v1(-17.565,-1.592) -17.565,-0.656 LED9_U_16_RGBs1.4@-17.529,-0.62
  Bottom Layer w0.1: U7_U_16_RGBs1.9@-17.571,-2.692 -17.568,-2.689 -17.568,-1.595 v1(-17.565,-1.592)
R8_U_16_RGBs2: LED9_U_16_RGBs2.4 U7_U_16_RGBs2.9 | length 2.1
  Top Layer w0.1: v1(-49.582,-1.584) -49.582,-0.647 LED9_U_16_RGBs2.4@-49.546,-0.612
  Bottom Layer w0.1: U7_U_16_RGBs2.9@-49.589,-2.684 -49.585,-2.681 -49.585,-1.587 v1(-49.582,-1.584)
R8_U_16_RGBs3: LED9_U_16_RGBs3.4 U7_U_16_RGBs3.9 | length 2.1
  Top Layer w0.1: v1(-81.618,-1.584) -81.618,-0.648 LED9_U_16_RGBs3.4@-81.582,-0.612
  Bottom Layer w0.1: U7_U_16_RGBs3.9@-81.625,-2.685 -81.622,-2.681 -81.622,-1.588 v1(-81.618,-1.584)
R8_U_16_RGBs4: LED9_U_16_RGBs4.4 U7_U_16_RGBs4.9 | length 2.1
  Top Layer w0.1: LED9_U_16_RGBs4.4@17.475,0.62 17.511,0.656 v1(17.511,1.592)
  Bottom Layer w0.1: v1(17.511,1.592) 17.514,1.595 17.514,2.689 U7_U_16_RGBs4.9@17.518,2.692
R8_U_16_RGBs5: LED9_U_16_RGBs5.4 U7_U_16_RGBs5.9 | length 2.1
  Top Layer w0.1: LED9_U_16_RGBs5.4@49.475,0.62 49.511,0.656 v1(49.511,1.592)
  Bottom Layer w0.1: v1(49.511,1.592) 49.514,1.595 49.514,2.689 U7_U_16_RGBs5.9@49.518,2.692
R8_U_16_RGBs6: LED9_U_16_RGBs6.4 U7_U_16_RGBs6.9 | length 2.1
  Top Layer w0.1: LED9_U_16_RGBs6.4@81.475,0.62 81.511,0.656 v1(81.511,1.592)
  Bottom Layer w0.1: v1(81.511,1.592) 81.514,1.595 81.514,2.689 U7_U_16_RGBs6.9@81.518,2.692
R9_U_16_RGBs1: LED10_U_16_RGBs1.4 U7_U_16_RGBs1.11 | length 2.4
  Top Layer w0.1: LED10_U_16_RGBs1.4@-19.529,-0.62 -19.505,-0.62 -19.204,-0.92 -19.204,-1.212 v1(-19.091,-1.325)
  Bottom Layer w0.1: v1(-19.091,-1.325) -19.042,-1.375 -19.042,-1.85 -18.841,-2.05 U7_U_16_RGBs1.11@-18.841,-2.692
R9_U_16_RGBs2: LED10_U_16_RGBs2.4 U7_U_16_RGBs2.11 | length 2.4
  Top Layer w0.1: LED10_U_16_RGBs2.4@-51.546,-0.612 -51.522,-0.612 -51.222,-0.912 -51.222,-1.204 v1(-51.109,-1.317)
  Bottom Layer w0.1: v1(-51.109,-1.317) -51.059,-1.366 -51.059,-1.842 -50.859,-2.042 U7_U_16_RGBs2.11@-50.859,-2.684
R9_U_16_RGBs3: LED10_U_16_RGBs3.4 U7_U_16_RGBs3.11 | length 2.4
  Top Layer w0.1: LED10_U_16_RGBs3.4@-83.582,-0.612 -83.558,-0.612 -83.258,-0.913 -83.258,-1.205 v1(-83.145,-1.318)
  Bottom Layer w0.1: v1(-83.145,-1.318) -83.095,-1.367 -83.095,-1.843 -82.895,-2.043 U7_U_16_RGBs3.11@-82.895,-2.685
R9_U_16_RGBs4: LED10_U_16_RGBs4.4 U7_U_16_RGBs4.11 | length 2.4
  Top Layer w0.1: v1(19.037,1.325) 19.15,1.212 19.15,0.92 19.451,0.62 LED10_U_16_RGBs4.4@19.475,0.62
  Bottom Layer w0.1: U7_U_16_RGBs4.11@18.788,2.692 18.788,2.05 18.988,1.85 18.988,1.375 v1(19.037,1.325)
R9_U_16_RGBs5: LED10_U_16_RGBs5.4 U7_U_16_RGBs5.11 | length 2.4
  Top Layer w0.1: v1(51.037,1.325) 51.15,1.212 51.15,0.92 51.451,0.62 LED10_U_16_RGBs5.4@51.475,0.62
  Bottom Layer w0.1: U7_U_16_RGBs5.11@50.788,2.692 50.788,2.05 50.988,1.85 50.988,1.375 v1(51.037,1.325)
R9_U_16_RGBs6: LED10_U_16_RGBs6.4 U7_U_16_RGBs6.11 | length 2.4
  Top Layer w0.1: v1(83.037,1.325) 83.15,1.212 83.15,0.92 83.451,0.62 LED10_U_16_RGBs6.4@83.475,0.62
  Bottom Layer w0.1: U7_U_16_RGBs6.11@82.788,2.692 82.788,2.05 82.988,1.85 82.988,1.375 v1(83.037,1.325)
R10_U_16_RGBs1: LED11_U_16_RGBs1.4 U7_U_16_RGBs1.12 | length 3.7
  Top Layer w0.1: LED11_U_16_RGBs1.4@-21.529,-0.62 -21.505,-0.62 -21.204,-0.92 -21.204,-0.944 -20.923,-1.226 -20.923,-1.451 -20.703,-1.67 -20.224,-1.67 -20.146,-1.592 v1(-19.572,-1.592)
  Bottom Layer w0.1: v1(-19.572,-1.592) -19.524,-1.64 -19.524,-2.644 U7_U_16_RGBs1.12@-19.476,-2.692
R10_U_16_RGBs2: LED11_U_16_RGBs2.4 U7_U_16_RGBs2.12 | length 3.8
  Top Layer w0.1: LED11_U_16_RGBs2.4@-53.546,-0.612 -53.522,-0.612 -53.222,-0.912 -53.222,-0.936 -52.984,-1.174 -52.984,-1.455 -52.752,-1.687 -52.441,-1.687 -52.337,-1.584 v1(-51.59,-1.584)
  Bottom Layer w0.1: v1(-51.59,-1.584) -51.542,-1.632 -51.542,-2.636 U7_U_16_RGBs2.12@-51.494,-2.684
R10_U_16_RGBs3: LED11_U_16_RGBs3.4 U7_U_16_RGBs3.12 | length 3.8
  Top Layer w0.1: LED11_U_16_RGBs3.4@-85.582,-0.612 -85.558,-0.612 -85.258,-0.913 -85.258,-0.937 -85.02,-1.174 -85.02,-1.455 -84.788,-1.688 -84.477,-1.688 -84.374,-1.584 v1(-83.626,-1.584)
  Bottom Layer w0.1: v1(-83.626,-1.584) -83.578,-1.632 -83.578,-2.637 U7_U_16_RGBs3.12@-83.53,-2.685
R10_U_16_RGBs4: LED11_U_16_RGBs4.4 U7_U_16_RGBs4.12 | length 3.8
  Top Layer w0.1: v1(19.518,1.592) 20.266,1.592 20.37,1.695 20.68,1.695 20.913,1.463 20.913,1.182 21.15,0.944 21.15,0.92 21.451,0.62 LED11_U_16_RGBs4.4@21.475,0.62
  Bottom Layer w0.1: U7_U_16_RGBs4.12@19.423,2.692 19.47,2.644 19.47,1.64 v1(19.518,1.592)
R10_U_16_RGBs5: LED11_U_16_RGBs5.4 U7_U_16_RGBs5.12 | length 3.8
  Top Layer w0.1: v1(51.518,1.592) 52.266,1.592 52.37,1.695 52.68,1.695 52.913,1.463 52.913,1.182 53.15,0.944 53.15,0.92 53.451,0.62 LED11_U_16_RGBs5.4@53.475,0.62
  Bottom Layer w0.1: U7_U_16_RGBs5.12@51.423,2.692 51.47,2.644 51.47,1.64 v1(51.518,1.592)
R10_U_16_RGBs6: LED11_U_16_RGBs6.4 U7_U_16_RGBs6.12 | length 3.8
  Top Layer w0.1: v1(83.518,1.592) 84.266,1.592 84.37,1.695 84.68,1.695 84.913,1.463 84.913,1.182 85.15,0.944 85.15,0.92 85.451,0.62 LED11_U_16_RGBs6.4@85.475,0.62
  Bottom Layer w0.1: U7_U_16_RGBs6.12@83.423,2.692 83.47,2.644 83.47,1.64 v1(83.518,1.592)
R11_U_16_RGBs1: LED12_U_16_RGBs1.4 U8_U_16_RGBs1.5 | length 4.2
  Top Layer w0.1: v1(-25.63,-1.592) -25.121,-1.592 -24.817,-1.895 -24.341,-1.895 -23.854,-1.408 -23.854,-0.92 -23.553,-0.62 LED12_U_16_RGBs1.4@-23.529,-0.62
  Bottom Layer w0.1: U8_U_16_RGBs1.5@-25.701,-2.692 -25.666,-2.657 -25.666,-1.627 v1(-25.63,-1.592)
R11_U_16_RGBs2: LED12_U_16_RGBs2.4 U8_U_16_RGBs2.5 | length 4.2
  Top Layer w0.1: v1(-57.648,-1.584) -57.138,-1.584 -56.834,-1.887 -56.358,-1.887 -55.871,-1.4 -55.871,-0.912 -55.57,-0.612 LED12_U_16_RGBs2.4@-55.546,-0.612
  Bottom Layer w0.1: U8_U_16_RGBs2.5@-57.719,-2.684 -57.683,-2.649 -57.683,-1.619 v1(-57.648,-1.584)
R11_U_16_RGBs3: LED12_U_16_RGBs3.4 U8_U_16_RGBs3.5 | length 4.2
  Top Layer w0.1: v1(-89.684,-1.584) -89.174,-1.584 -88.871,-1.888 -88.394,-1.888 -87.907,-1.4 -87.907,-0.913 -87.607,-0.612 LED12_U_16_RGBs3.4@-87.582,-0.612
  Bottom Layer w0.1: U8_U_16_RGBs3.5@-89.755,-2.685 -89.719,-2.649 -89.719,-1.62 v1(-89.684,-1.584)
R11_U_16_RGBs4: LED12_U_16_RGBs4.4 U8_U_16_RGBs4.5 | length 4.2
  Top Layer w0.1: LED12_U_16_RGBs4.4@23.475,0.62 23.499,0.62 23.8,0.92 23.8,1.408 24.287,1.895 24.763,1.895 25.067,1.592 v1(25.576,1.592)
  Bottom Layer w0.1: v1(25.576,1.592) 25.612,1.627 25.612,2.657 U8_U_16_RGBs4.5@25.648,2.692
R11_U_16_RGBs5: LED12_U_16_RGBs5.4 U8_U_16_RGBs5.5 | length 4.2
  Top Layer w0.1: LED12_U_16_RGBs5.4@55.475,0.62 55.499,0.62 55.8,0.92 55.8,1.408 56.287,1.895 56.763,1.895 57.067,1.592 v1(57.576,1.592)
  Bottom Layer w0.1: v1(57.576,1.592) 57.612,1.627 57.612,2.657 U8_U_16_RGBs5.5@57.647,2.692
R11_U_16_RGBs6: LED12_U_16_RGBs6.4 U8_U_16_RGBs6.5 | length 4.2
  Top Layer w0.1: LED12_U_16_RGBs6.4@87.475,0.62 87.499,0.62 87.8,0.92 87.8,1.408 88.287,1.895 88.763,1.895 89.067,1.592 v1(89.576,1.592)
  Bottom Layer w0.1: v1(89.576,1.592) 89.612,1.627 89.612,2.657 U8_U_16_RGBs6.5@89.648,2.692
R12_U_16_RGBs1: LED13_U_16_RGBs1.4 U8_U_16_RGBs1.7 | length 3.3
  Top Layer w0.1: v1(-27.054,-1.598) -26.959,-1.598 -26.862,-1.695 -26.424,-1.695 -26.204,-1.476 -26.204,-1.295 -25.854,-0.944 -25.854,-0.92 -25.553,-0.62 LED13_U_16_RGBs1.4@-25.529,-0.62
  Bottom Layer w0.1: v1(-27.054,-1.598) -27.013,-1.639 -27.013,-2.651 U8_U_16_RGBs1.7@-26.971,-2.692
R12_U_16_RGBs2: LED13_U_16_RGBs2.4 U8_U_16_RGBs2.7 | length 3.3
  Top Layer w0.1: v1(-59.071,-1.59) -58.976,-1.59 -58.879,-1.687 -58.441,-1.687 -58.221,-1.467 -58.221,-1.287 -57.871,-0.936 -57.871,-0.912 -57.57,-0.612 LED13_U_16_RGBs2.4@-57.546,-0.612
  Bottom Layer w0.1: v1(-59.071,-1.59) -59.03,-1.631 -59.03,-2.643 U8_U_16_RGBs2.7@-58.989,-2.684
R12_U_16_RGBs3: LED13_U_16_RGBs3.4 U8_U_16_RGBs3.7 | length 3.3
  Top Layer w0.1: v1(-91.107,-1.591) -91.012,-1.591 -90.915,-1.688 -90.477,-1.688 -90.257,-1.468 -90.257,-1.287 -89.907,-0.937 -89.907,-0.913 -89.607,-0.612 LED13_U_16_RGBs3.4@-89.582,-0.612
  Bottom Layer w0.1: v1(-91.107,-1.591) -91.066,-1.632 -91.066,-2.644 U8_U_16_RGBs3.7@-91.025,-2.685
R12_U_16_RGBs4: LED13_U_16_RGBs4.4 U8_U_16_RGBs4.7 | length 3.3
  Top Layer w0.1: LED13_U_16_RGBs4.4@25.475,0.62 25.499,0.62 25.8,0.92 25.8,0.944 26.15,1.295 26.15,1.476 26.37,1.695 26.808,1.695 26.905,1.598 v1(27,1.598)
  Bottom Layer w0.1: U8_U_16_RGBs4.7@26.918,2.692 26.959,2.651 26.959,1.639 v1(27,1.598)
R12_U_16_RGBs5: LED13_U_16_RGBs5.4 U8_U_16_RGBs5.7 | length 3.3
  Top Layer w0.1: LED13_U_16_RGBs5.4@57.475,0.62 57.499,0.62 57.8,0.92 57.8,0.944 58.15,1.295 58.15,1.476 58.37,1.695 58.808,1.695 58.905,1.598 v1(59,1.598)
  Bottom Layer w0.1: U8_U_16_RGBs5.7@58.917,2.692 58.959,2.651 58.959,1.639 v1(59,1.598)
R12_U_16_RGBs6: LED13_U_16_RGBs6.4 U8_U_16_RGBs6.7 | length 3.3
  Top Layer w0.1: LED13_U_16_RGBs6.4@89.475,0.62 89.499,0.62 89.8,0.92 89.8,0.944 90.15,1.295 90.15,1.476 90.37,1.695 90.808,1.695 90.905,1.598 v1(91,1.598)
  Bottom Layer w0.1: U8_U_16_RGBs6.7@90.918,2.692 90.959,2.651 90.959,1.639 v1(91,1.598)
R13_U_16_RGBs1: LED14_U_16_RGBs1.4 U8_U_16_RGBs1.8 | length 2.1
  Top Layer w0.1: v1(-27.606,-1.592) -27.606,-0.697 LED14_U_16_RGBs1.4@-27.529,-0.62
  Bottom Layer w0.1: U8_U_16_RGBs1.8@-27.606,-2.692 v1(-27.606,-1.592)
R13_U_16_RGBs2: LED14_U_16_RGBs2.4 U8_U_16_RGBs2.8 | length 2.1
  Top Layer w0.1: v1(-59.624,-1.584) -59.624,-0.689 LED14_U_16_RGBs2.4@-59.546,-0.612
  Bottom Layer w0.1: U8_U_16_RGBs2.8@-59.624,-2.684 v1(-59.624,-1.584)
R13_U_16_RGBs3: LED14_U_16_RGBs3.4 U8_U_16_RGBs3.8 | length 2.1
  Top Layer w0.1: v1(-91.66,-1.584) -91.66,-0.69 LED14_U_16_RGBs3.4@-91.582,-0.612
  Bottom Layer w0.1: U8_U_16_RGBs3.8@-91.66,-2.685 v1(-91.66,-1.584)
R13_U_16_RGBs4: LED14_U_16_RGBs4.4 U8_U_16_RGBs4.8 | length 2.1
  Top Layer w0.1: LED14_U_16_RGBs4.4@27.475,0.62 27.553,0.697 v1(27.553,1.592)
  Bottom Layer w0.1: v1(27.553,1.592) U8_U_16_RGBs4.8@27.553,2.692
R13_U_16_RGBs5: LED14_U_16_RGBs5.4 U8_U_16_RGBs5.8 | length 2.1
  Top Layer w0.1: LED14_U_16_RGBs5.4@59.475,0.62 59.552,0.697 v1(59.552,1.592)
  Bottom Layer w0.1: v1(59.552,1.592) U8_U_16_RGBs5.8@59.552,2.692
R13_U_16_RGBs6: LED14_U_16_RGBs6.4 U8_U_16_RGBs6.8 | length 2.1
  Top Layer w0.1: LED14_U_16_RGBs6.4@91.475,0.62 91.553,0.697 v1(91.553,1.592)
  Bottom Layer w0.1: v1(91.553,1.592) U8_U_16_RGBs6.8@91.553,2.692
R14_U_16_RGBs1: LED15_U_16_RGBs1.4 U8_U_16_RGBs1.10 | length 2.3
  Top Layer w0.1: LED15_U_16_RGBs1.4@-29.529,-0.62 -29.285,-0.864 v1(-29.285,-1.671)
  Bottom Layer w0.1: v1(-29.285,-1.671) -29.285,-1.691 -28.876,-2.099 U8_U_16_RGBs1.10@-28.876,-2.692
R14_U_16_RGBs2: LED15_U_16_RGBs2.4 U8_U_16_RGBs2.10 | length 2.3
  Top Layer w0.1: LED15_U_16_RGBs2.4@-61.546,-0.612 -61.375,-0.783 v1(-61.375,-1.575)
  Bottom Layer w0.1: v1(-61.375,-1.575) -61.375,-1.603 -60.894,-2.084 U8_U_16_RGBs2.10@-60.894,-2.684
R14_U_16_RGBs3: LED15_U_16_RGBs3.4 U8_U_16_RGBs3.10 | length 2.3
  Top Layer w0.1: LED15_U_16_RGBs3.4@-93.582,-0.612 -93.325,-0.87 v1(-93.325,-1.475)
  Bottom Layer w0.1: v1(-93.325,-1.475) -93.258,-1.542 -93.258,-1.785 -92.93,-2.113 U8_U_16_RGBs3.10@-92.93,-2.685
R14_U_16_RGBs4: LED15_U_16_RGBs4.4 U8_U_16_RGBs4.10 | length 2.3
  Top Layer w0.1: v1(29.313,1.629) 29.378,1.565 29.378,0.717 LED15_U_16_RGBs4.4@29.475,0.62
  Bottom Layer w0.1: U8_U_16_RGBs4.10@28.823,2.692 28.823,2.12 v1@29.313,1.629
R14_U_16_RGBs5: LED15_U_16_RGBs5.4 U8_U_16_RGBs5.10 | length 2.3
  Top Layer w0.1: v1(61.225,1.55) 61.225,0.87 LED15_U_16_RGBs5.4@61.475,0.62
  Bottom Layer w0.1: U8_U_16_RGBs5.10@60.822,2.692 60.871,2.644 60.871,1.904 v1(61.225,1.55)
R14_U_16_RGBs6: LED15_U_16_RGBs6.4 U8_U_16_RGBs6.10 | length 2.3
  Top Layer w0.1: v1(93.324,1.582) 93.378,1.528 93.378,0.717 LED15_U_16_RGBs6.4@93.475,0.62
  Bottom Layer w0.1: U8_U_16_RGBs6.10@92.823,2.692 92.823,2.102 93.324,1.6 v1(93.324,1.582)
R15_U_16_RGBs1: LED16_U_16_RGBs1.4 U8_U_16_RGBs1.12 | length 2.9
  Top Layer w0.1: LED16_U_16_RGBs1.4@-31.529,-0.62 -31.505,-0.62 -31.204,-0.92 -31.204,-1.425 -30.919,-1.711 v1(-30.919,-1.806)
  Bottom Layer w0.1: v1(-30.919,-1.806) -30.824,-1.806 -30.559,-2.071 -30.265,-2.071 -30.146,-2.189 U8_U_16_RGBs1.12@-30.146,-2.692
R15_U_16_RGBs2: LED16_U_16_RGBs2.4 U8_U_16_RGBs2.12 | length 2.9
  Top Layer w0.1: LED16_U_16_RGBs2.4@-63.546,-0.612 -63.522,-0.612 -63.222,-0.912 -63.222,-1.417 -62.936,-1.703 v1(-62.936,-1.797)
  Bottom Layer w0.1: v1(-62.936,-1.797) -62.841,-1.797 -62.576,-2.063 -62.282,-2.063 -62.164,-2.181 U8_U_16_RGBs2.12@-62.164,-2.684
R15_U_16_RGBs3: LED16_U_16_RGBs3.4 U8_U_16_RGBs3.12 | length 2.9
  Top Layer w0.1: LED16_U_16_RGBs3.4@-95.582,-0.612 -95.558,-0.612 -95.258,-0.913 -95.258,-1.418 -94.972,-1.703 v1(-94.972,-1.798)
  Bottom Layer w0.1: v1(-94.972,-1.798) -94.878,-1.798 -94.613,-2.063 -94.318,-2.063 -94.2,-2.181 U8_U_16_RGBs3.12@-94.2,-2.685
R15_U_16_RGBs4: LED16_U_16_RGBs4.4 U8_U_16_RGBs4.12 | length 2.9
  Top Layer w0.1: v1(30.865,1.806) 30.865,1.711 31.15,1.425 31.15,0.92 31.451,0.62 LED16_U_16_RGBs4.4@31.475,0.62
  Bottom Layer w0.1: U8_U_16_RGBs4.12@30.093,2.692 30.093,2.189 30.211,2.071 30.505,2.071 30.77,1.806 v1(30.865,1.806)
R15_U_16_RGBs5: LED16_U_16_RGBs5.4 U8_U_16_RGBs5.12 | length 2.9
  Top Layer w0.1: v1(62.865,1.806) 62.865,1.711 63.15,1.425 63.15,0.92 63.451,0.62 LED16_U_16_RGBs5.4@63.475,0.62
  Bottom Layer w0.1: U8_U_16_RGBs5.12@62.092,2.692 62.092,2.189 62.211,2.071 62.505,2.071 62.77,1.806 v1(62.865,1.806)
R15_U_16_RGBs6: LED16_U_16_RGBs6.4 U8_U_16_RGBs6.12 | length 2.9
  Top Layer w0.1: v1(94.865,1.806) 94.865,1.711 95.15,1.425 95.15,0.92 95.451,0.62 LED16_U_16_RGBs6.4@95.475,0.62
  Bottom Layer w0.1: U8_U_16_RGBs6.12@94.093,2.692 94.093,2.189 94.211,2.071 94.505,2.071 94.77,1.806 v1(94.865,1.806)
RESET_ESP: C34.2 MD1.8 R17.1 SW3.2 | length 7.8
  Top Layer w0.1: MD1.8@5.9,-10.25 7.398,-10.25 R17.1@7.423,-10.275 7.423,-8.952 7.772,-8.603 7.772,-8.278 8.225,-7.825 8.225,-7.029 8.51,-6.744 9.875,-6.744 10.35,-7.219 SW3.2@10.35,-7.425
RESET_RP: R8.2 SW2.2 | length 4.7
  Top Layer w0.1: R8.2@-2.45,7.352 -2.191,7.611 -1.903,7.611 -1.4,8.113 -1.4,10.4 -1.875,10.875 SW2.2@-2.25,10.875
RP_USB_D_N: R5.2 U10.2 | length 34
  Top Layer w0.24: U10.2@-16.4,15.55 -16.38,15.57 -16.38,15.705 -16.371,15.705 -16.22,15.856 -16.22,15.887 -15.999,16.107 -15.376,16.107 -15.261,15.993 -12.33,15.993 -9.525,13.188 -8.056,13.188 -7.325,13.919 -7.325,16.196 -7.976,16.847 -7.976,21.623 -7.717,21.883 -2.694,21.883 -1.582,22.994 3.079,22.994 3.335,22.738 3.544,22.738 3.565,22.76 4.839,22.76 5.312,22.286 5.816,22.286 R5.2@6.125,21.977
RP_USB_D_P: R4.2 U10.1 | length 31.2
  Top Layer w0.24: U10.1@-15.9,15.55 -12.514,15.55 -9.708,12.745 -7.873,12.745 -6.882,13.735 -6.882,16.38 -7.533,17.031 -7.533,21.44 -2.51,21.44 -1.399,22.551 2.895,22.551 3.151,22.295 3.727,22.295 3.749,22.317 3.989,22.317 4.02,22.286 4.116,22.286 R4.2@4.425,21.977
USB_D_N: U10.7 USBC1.A7 USBC1.B7 | length 8.6
  Top Layer w0.2: -16.9,13.566 U10.7@-16.9,14.2
  Top Layer w0.261: -16.9,13.566 -16.228,12.894 -12.985,12.894 -12.915,12.824 v1(-12.399,12.824)
  Bottom Layer w0.261: v1(-12.399,12.824) -12.037,12.461 ; USBC1.B7@-11.723,11.529 -12.272,12.077 -12.272,12.227 -12.199,12.3 -12.037,12.461 ; USBC1.A7@-11.016,12.236 -11.044,12.236 -11.575,12.767 -11.731,12.767 -12.037,12.461
USB_D_P: U10.8 USBC1.A6 USBC1.B6 | length 9.3
  Top Layer w0.261: U10.8@-16.4,14.2 -16.4,13.723 -16.035,13.358 -11.408,13.358 v1(-11.4,13.35)
  Bottom Layer w0.261: v1(-11.4,13.35) -11.4,13.327 USBC1.B6@-10.662,12.59 -10.662,12.562 -10.22,12.119 -10.22,11.732 -10.645,11.307 -10.794,11.307 USBC1.A6@-11.37,11.882
USB_MCU_D_N: R5.1 U1.51 | length 6.7
  Top Layer w0.24: R5.1@6.125,20.423 5.816,20.114 5.596,20.114 5.496,20.014 5.496,19.855 5.61,19.742 6.481,19.742 7.084,19.138 7.084,16.613 7.207,16.491 7.207,16.473 7.48,16.2 7.48,15.628 7.399,15.547 U1.51@7.399,15.45
USB_MCU_D_P: R4.1 U1.52 | length 6.4
  Top Layer w0.24: R4.1@4.425,20.423 4.734,20.114 4.954,20.114 5.054,20.014 5.054,19.672 5.426,19.299 6.297,19.299 6.641,18.955 6.641,16.43 6.764,16.307 6.764,16.289 7.037,16.016 7.037,15.812 U1.52@7,15.775
pads on no net: MD1.4 MD1.6 MD1.7 MD1.9 MD1.10 MD1.13 MD1.15 MD1.17 MD1.18 MD1.19 MD1.24 MD1.25 MD1.28 MD1.29 MD1.30 MD1.31 MD1.32 MD1.33 MD1.34 MD1.35 U1.28 U6_U_16_RGBs1.22 U6_U_16_RGBs2.22 U6_U_16_RGBs3.22 U6_U_16_RGBs4.22 U6_U_16_RGBs5.22 U6_U_16_RGBs6.22 U7_U_16_RGBs1.22 U7_U_16_RGBs2.22 U7_U_16_RGBs3.22 U7_U_16_RGBs4.22 U7_U_16_RGBs5.22 U7_U_16_RGBs6.22 U8_U_16_RGBs1.22 U8_U_16_RGBs2.22 U8_U_16_RGBs3.22 U8_U_16_RGBs4.22 U8_U_16_RGBs5.22 U8_U_16_RGBs6.22 USBC1.A8 USBC1.B8

## Polygon pours and split planes (outlines as drawn)
+5V on Power "+5V_L03_P004" (solid, pour order 4): 25.8,8.6 26.7,7.7 105.2,7.7 105.2,-9.4 103.7,-10.9 102.5,-9.7 27.2,-9.7 27.2,-12.1 11.7,-27.6 11.6,-27.5 -15.4,-27.5 -15.4,-25.3 -31.3,-9.4 -104,-9.4 -104,9.2 -103.3,8.5 -29.2,8.5 -29.2,11.9 -8.3,32.8 -1,25.5 21.4,25.5
+3V3_RP on Power "+3V3_RP_L03_P002" (solid, pour order 2): 15.2,4.2 13.975,2.975 -3.3,2.975 -3.3,24 14,24 14,20.5 15.4,19.1
GND on Top Layer "GND_ESP" (solid, pour order 6): 2.8,-9.05 2.8,-14.7 -3,-14.7 -3,-9.05
+5V on Top Layer "5V" (solid, pour order 7): -12.575,7.125 -11.875,7.825 -11.875,8.025 -8.325,8.025 -8.225,7.925 -8.225,5.925 -11.65,5.925 -11.875,5.7 -13.525,5.7 -13.525,7.125
GND on GND "GND_L02_P000" (solid, pour order 0): 16.8,23.2 28.9,11.1 28.9,9.3 101.9,9.3 105.5,5.7 105.5,-8.7 27.4,-8.7 9.7,-26.4 -12.7,-26.4 -30.4,-8.7 -101.7,-8.7 -104,-6.4 -104,8 -30.3,8 -12.5,25.8 11.9,25.8

## Keep-outs
Keep-Out Layer:
  rectangle: -22.85,-25.5 23.475,-17.25

## Other copper
Bottom Layer:
  region net GND: -13.703,10.468 -13.915,10.256 -14.127,10.044 -13.208,9.125 -12.996,9.337 -12.784,9.549 -13.703,10.468
  region net NetD1_2: -13.137,11.034 -13.349,10.822 -13.562,10.61 -12.642,9.69 -12.43,9.903 -12.218,10.115 -13.137,11.034

## Silkscreen, mask and mechanical layers (free items; w line width, h text height)
Top Overlay:
  lines w0.15: -64,-1.25 -64,-1.235 ; -32,-1.25 -32,-1.235 ; 0,1.25 0,1.265 ; 32,1.235 32,1.25 ; 64,1.25 64,1.265
  text "BTSEL" at -7.5,16.5 h0.8 r90
  text "ESP" at -15.3,12.4 h0.8
  text "RP" at -5.375,12.325 h0.8
  text "RST" at -1.7,8.15 h0.8 r90
  text "POV Display V2.0" at -6.881,-3.542 h1
  text "J.D 2026" at -3.174,-5.375 h1
  text "RST" at 11.5,-5.475 h0.8
  text "BTSEL" at -7.8,-16.6 h0.8 r90
Mechanical 9:
  lines w0.1: -97.5,-6.005 -23.478,-6.005 -23.266,-6.005 ; -97.5,-6.005 cw(c-97.5,0) -103.505,0 cw(c-97.5,0) -97.5,6.005 -23.478,6.005 ; -23.478,5.505 -23.246,5.505 ; -23.244,-6 ccw(c0,0) 0,-24.005 ccw(c0,0) 23.247,-5.986 ; -23.241,6.011 cw(c0,0) 0,24.005 cw(c0,0) 23.241,6.011 ; 23.246,6.005 23.478,6.005 97.5,6.005 cw(c97.5,0) 103.505,0 cw(c97.5,0) 97.5,-6.005 23.478,-6.005 23.266,-6.005